# Altium PCB My heater.PcbDoc (part 1 of 2)
Units mm, origin at the board's own origin, x right, y up, seen from the top; angles counter-clockwise.
Board outline 202.87 x 80.18 mm, 2 copper layers (Top Layer, Bottom Layer); 154 components, 161 nets, 495 pads, 412 vias.
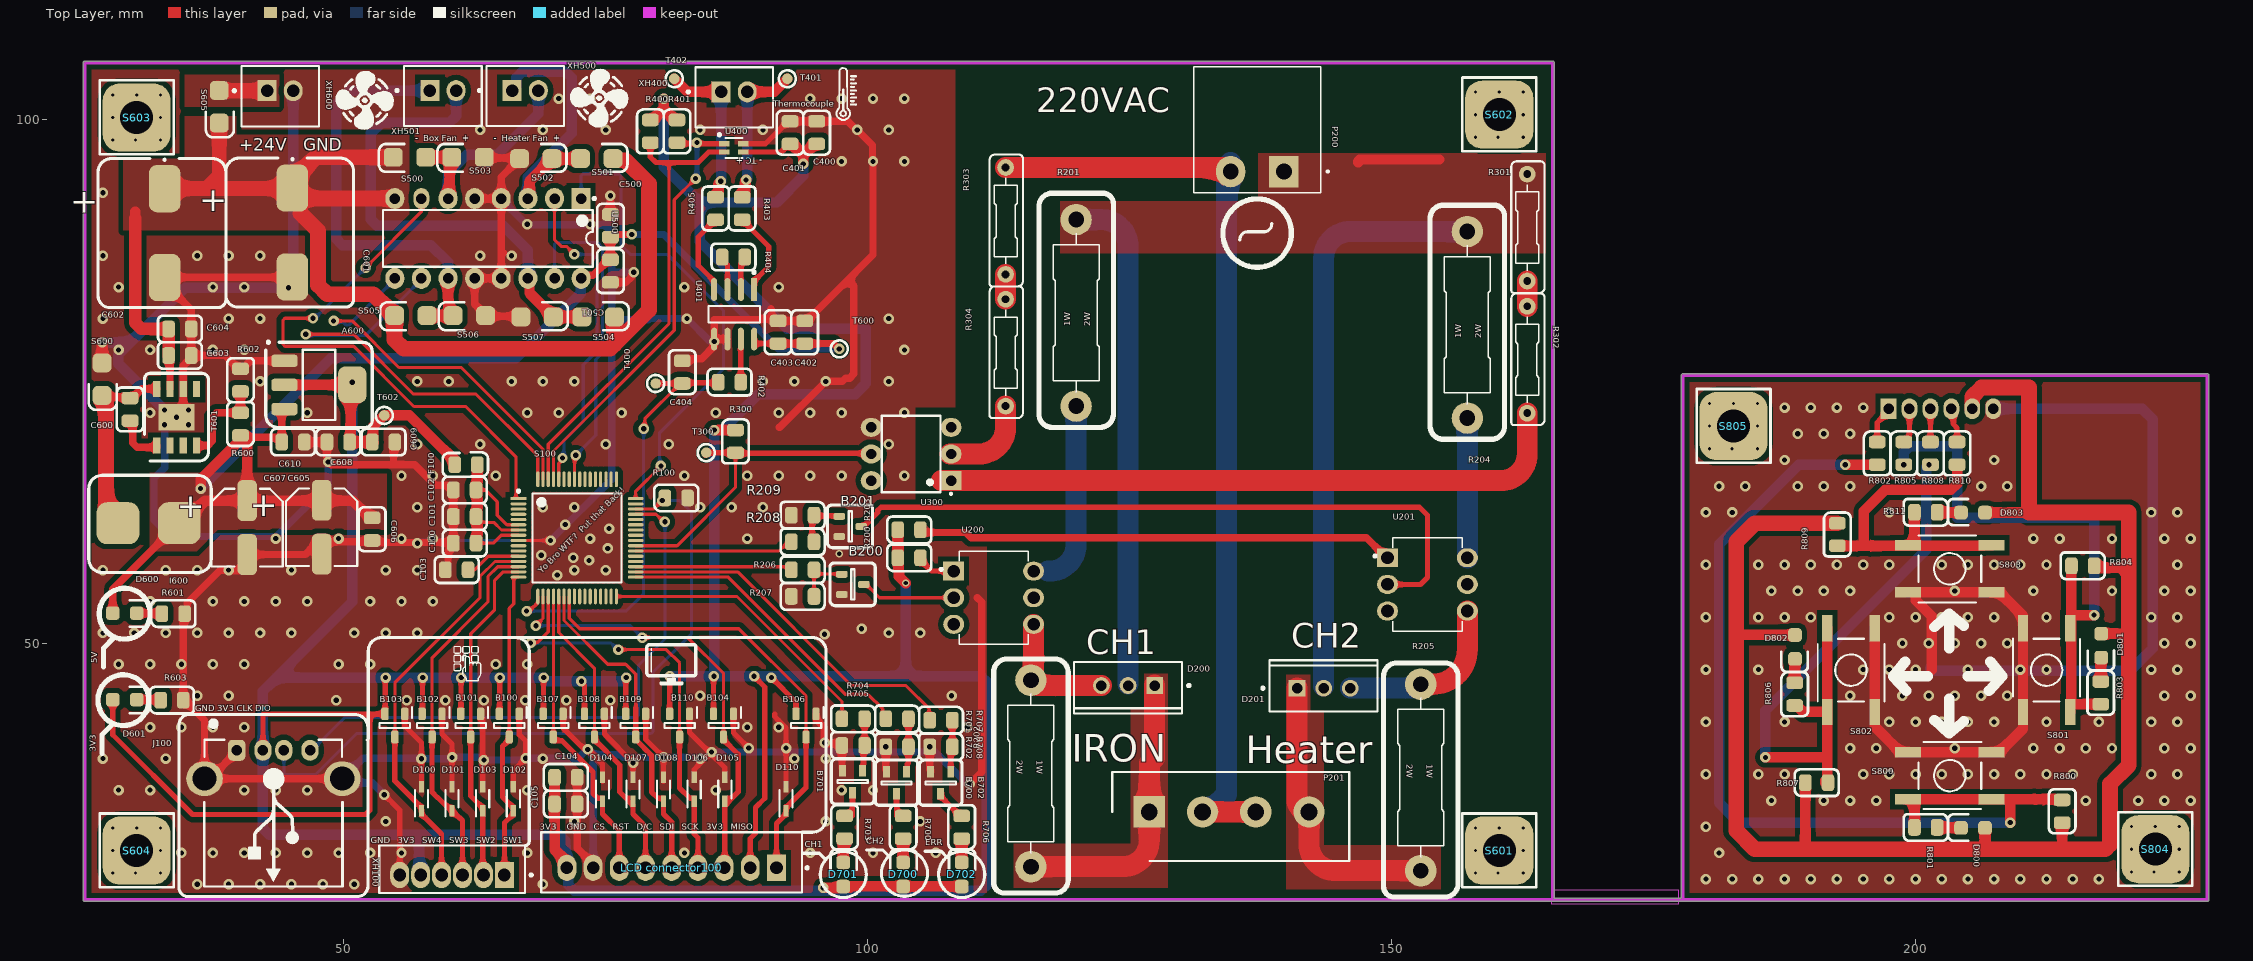
[diagram p0: Top Layer view]
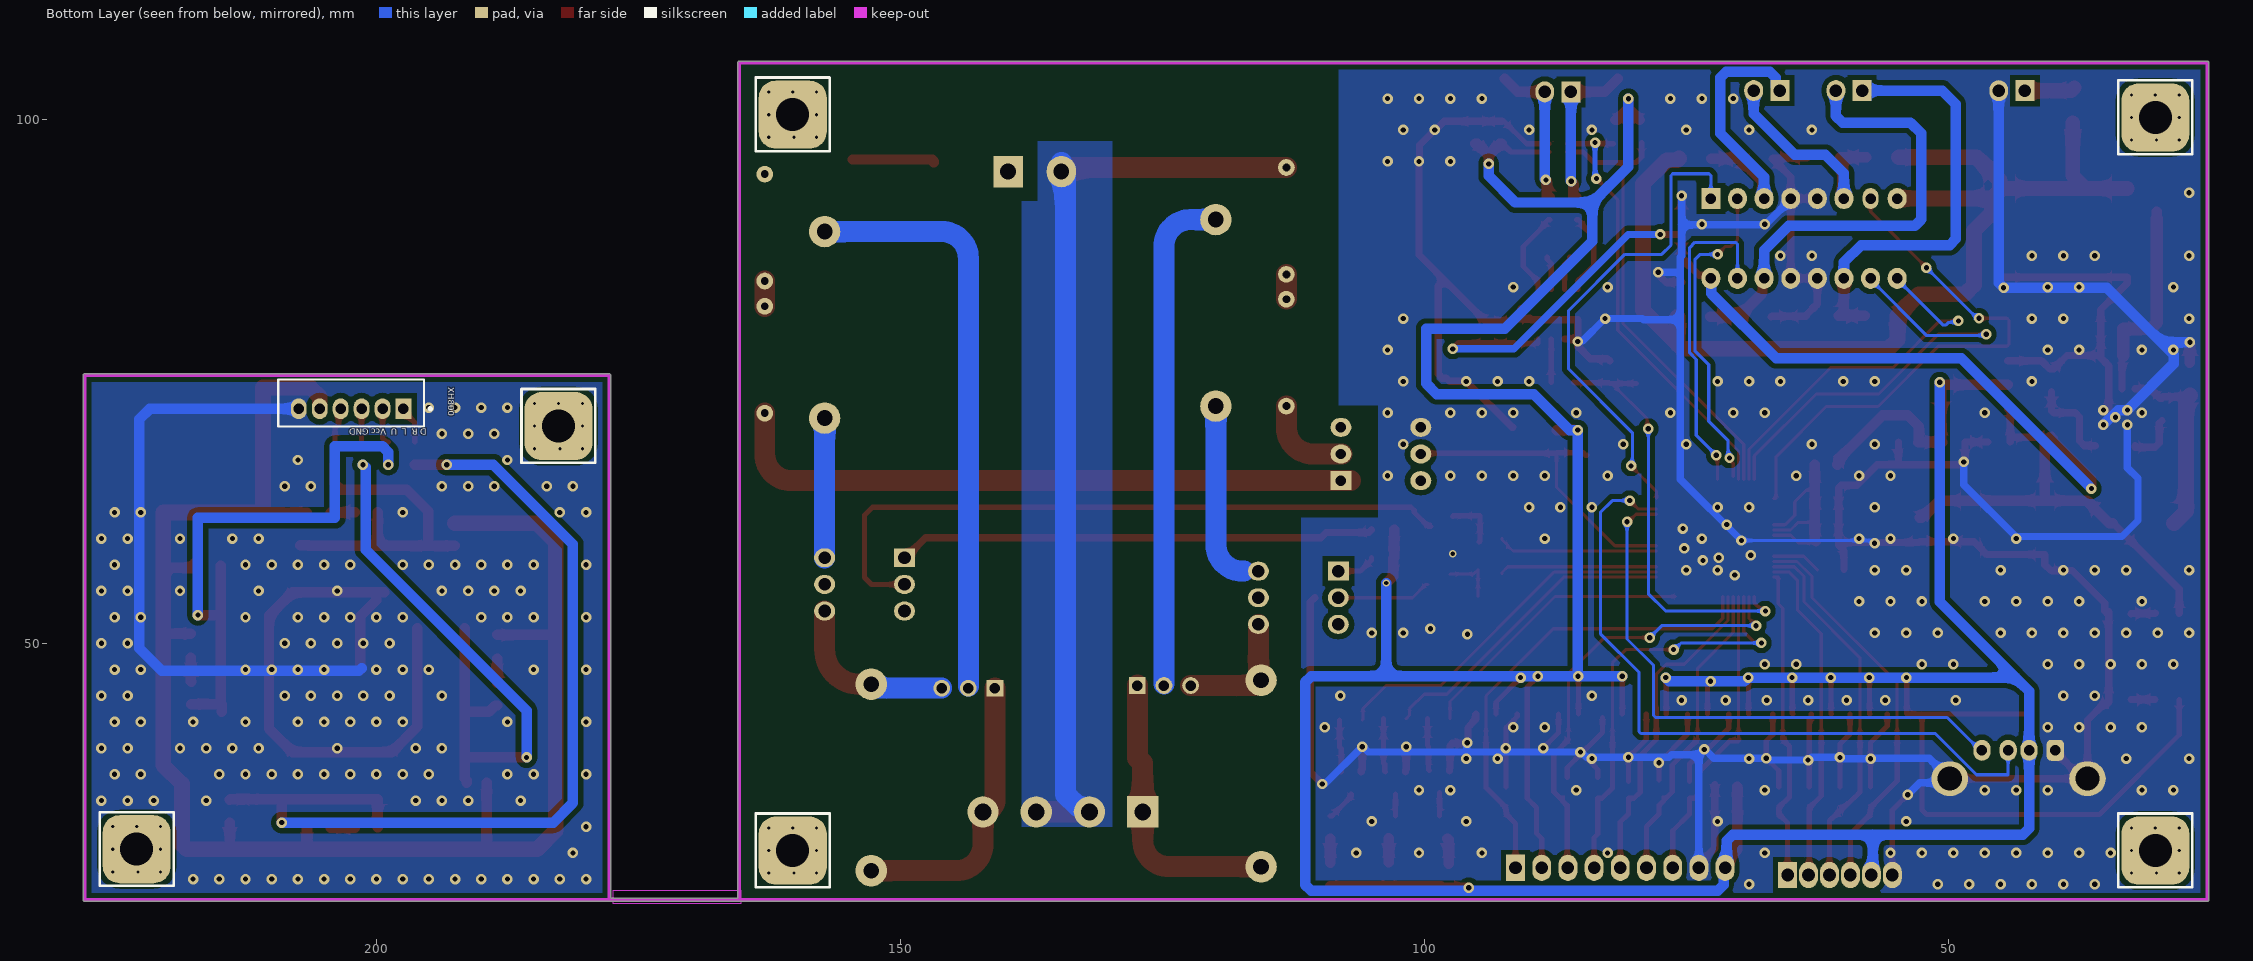
[diagram p1: Bottom Layer view, seen from below]
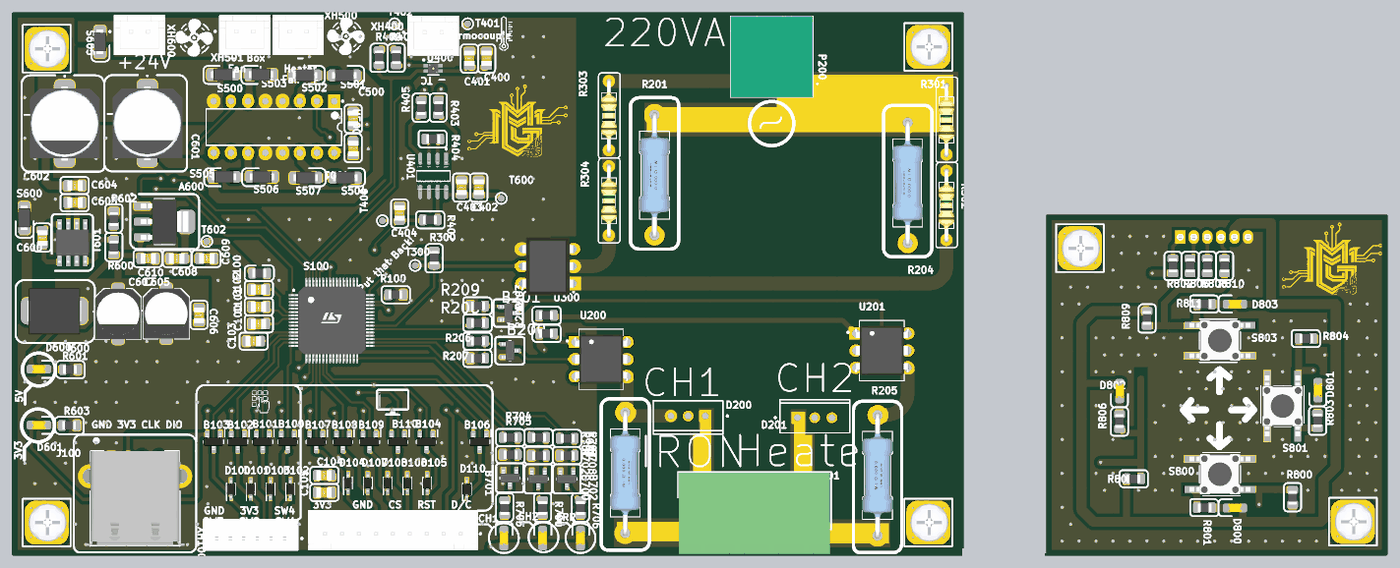
[diagram p3: 3D render of the assembled board from above, using the file's embedded part models]

## Layer stack, top to bottom
Top Solder: solder mask 0.0102, Solder Resist, Dk 3.5
Top Layer: signal copper 0.0356
Dielectric 1: dielectric 0.32, FR-4, Dk 4.8
Bottom Layer: signal copper 0.0356
Bottom Solder: solder mask 0.0102, Solder Resist, Dk 3.5

## Board outline
25.123,25.527 25.123,105.41 cw(c25.273,105.41) 25.273,105.56 165.354,105.56 cw(c165.354,105.41) 165.504,105.41 165.504,25.677 177.65,25.677 177.65,75.565 cw(c177.8,75.565) 177.8,75.715 227.838,75.715 cw(c227.838,75.565) 227.988,75.565 227.988,25.527 cw(c227.838,25.527) 227.838,25.377 25.273,25.377 cw(c25.273,25.527)
cut-out: 165.227,26.416 165.227,25.146 177.419,25.146 177.419,26.416

## Design rules (kind name [scope] priority, off if disabled: settings)
Clearance Clearance_1 [InNamedPolygon('NONET_L-01_P-001')] p1: gap=0.5 ignorepadtopadclearanceinfootprint=TRUE
Clearance [All] p2: gap=0.2 ignorepadtopadclearanceinfootprint=TRUE
PolygonConnect PolygonConnect_9 [All] p1: connectstyle=Direct reliefconductorwidth=0.254 reliefentries=4 polygonreliefangle="90 Angle" airgapwidth=0.254
RoutingVias [All] p1: holewidth=0.711 width=1.27 viastyle="Through Hole" minholewidth=0.711 minwidth=1.27 maxholewidth=3 maxwidth=6
SolderMaskExpansion [All] p1: expansion=0.102 istentingtop=FALSE
SupplyNets "Schematic Supply Nets_10" [InNet('GND5')] p1: voltage=0.000
SupplyNets "Schematic Supply Nets_9" [InNet('VCC IN')] p2: voltage=0.000
SupplyNets "Schematic Supply Nets_8" [InNet('GND3')] p3: voltage=0.000
SupplyNets "Schematic Supply Nets_7" [InNet('+220V')] p4: voltage=0.000
SupplyNets "Schematic Supply Nets_6" [InNet('+5')] p5: voltage=0.000
SupplyNets "Schematic Supply Nets_5" [InNet('AGND')] p6: voltage=0.000
SupplyNets "Schematic Supply Nets_4" [InNet('GND')] p7: voltage=0.000
SupplyNets "Schematic Supply Nets_3" [InNet('+24')] p8: voltage=0.000
SupplyNets "Schematic Supply Nets_2" [InNet('3v3')] p9: voltage=0.000
SupplyNets "Schematic Supply Nets_1" [InNet('VCC')] p10: voltage=0.000
SupplyNets "Schematic Supply Nets" [InNet('GND2')] p11: voltage=0.000
Width [All] p1: maxlimit=6 minlimit=0.254 preferedwidth=0.254
30 further rules are at their usual default settings.

## Classes and differential pairs
component class "ZERO CROSS": R300 R301 R302 R303 R304 T300 U300
component class "Temp feedback": C400 C401 C402 C403 C404 R400 R401 R402 R403 R404 R405 T400 T401 T402 U400 U401 XH400
component class POWER: A600 C600 C601 C602 C603 C604 C605 C606 C607 C608 C609 C610 D600 D601 I600 R600 R601 R602 R603 S600 S601 S602 S603 S604 S605 T600 T601 T602 XH600
component class MCU: B100 B101 B102 B103 B104 B106 B107 B108 B109 B110 C100 C101 C102 C103 C104 C105 D100 D101 D102 D103 D104 D105 D106 D107 D108 D110 F100 J100 "LCD connector100" R100 S100 XH100
component class LEDs: B700 B701 B702 D700 D701 D702 R700 R701 R702 R703 R704 R705 R706 R707 R708
component class KEYPAD: D800 D801 D802 D803 R800 R801 R802 R803 R804 R805 R806 R807 R808 R809 R810 R811 S800 S801 S802 S803 S804 S805 XH800
component class "Fan Controller": C500 C501 S500 S501 S502 S503 S504 S505 S506 S507 U500 XH500 XH501
component class DIMMER: B200 B201 D200 D201 P200 P201 R200 R201 R202 R203 R204 R205 R206 R207 R208 R209 U200 U201

## Components (designator, comment, footprint, x,y, rotation, side; value= is the part's Value field where it differs from the comment)
A600 "AMS1117 3.3V" SOT230P700X180-4M 47.625,74.676 r180 top
B100 "Bat54s" PCBComponent_1#1 65.786,42.037 r270 top
B101 "Bat54s" PCBComponent_1#1 62.103,42.037 r270 top
B102 "Bat54s" PCBComponent_1#1 58.42,42.037 r270 top
B103 "Bat54s" PCBComponent_1#1 54.864,42.037 r270 top
B104 "Bat54s" PCBComponent_1#1 86.233,42.037 r270 top
B106 "Bat54s" PCBComponent_1#1 94.107,42.037 r270 top
B107 "Bat54s" PCBComponent_1#1 69.977,42.037 r270 top
B108 "Bat54s" PCBComponent_1#1 73.914,42.037 r270 top
B109 "Bat54s" PCBComponent_1#1 77.851,42.037 r270 top
B110 "Bat54s" PCBComponent_1#1 82.042,42.037 r270 top
B200 "BC817" BC817 98.679,55.753 r0 top
B201 "BC817" BC817 98.436,61.285 r0 top
B700 "BC817" PCBComponent_1#2 102.87,36.703 r270 top
B701 "BC817" PCBComponent_1#2 98.679,36.83 r270 top
B702 "BC817" PCBComponent_1#2 107.084,36.703 r270 top
C100 "Cap 4.7uf 0805" "Cap 0805" 61.341,59.69 r180 top
C101 "Cap 100nf 0805" "Cap 0805" 61.341,62.23 r180 top
C102 "Cap 100nf 0805" "Cap 0805" 61.341,64.77 r180 top
C103 "Cap 100nf 0805" "Cap 0805" 60.579,57.15 r180 top
C104 "Cap 100nf 0805" "Cap 0805" 70.993,37.338 r180 top
C105 "Cap 10uf 0805" "Cap 0805" 70.993,34.798 r180 top
C400 "Cap 10uf 0805" "Cap 0805" 95.25,98.933 r90 top
C401 "Cap 100nf 0805" "Cap 0805" 92.71,98.933 r90 top
C402 "Cap 10uf 0805" "Cap 0805" 94.107,79.883 r90 top
C403 "Cap 100nf 0805" "Cap 0805" 91.567,79.883 r90 top
C404 "Cap 100nf 0805" "Cap 0805" 82.423,76.073 r90 top
C500 "Cap 10uf 0805" "Cap 0805" 75.565,90.043 r90 top
C501 "Cap 100nf 0805" "Cap 0805" 75.311,85.344 r270 top
C600 "Cap 10nf 0805" "Cap 0805" 29.464,72.136 r270 top
C601 "Cap 220uf 10x10" "Cap 10x10" 44.577,89.838 r270 top
C602 "Cap 220uf 10x10" "Cap 10x10" 32.385,89.789 r270 top
C603 "Cap 10nf 0805" "Cap 0805" 34.544,77.343 r0 top
C604 "Cap 4.7uf 0805" "Cap 0805" 34.544,79.883 r0 top
C605 "Cap 3300uf 6.3X5.6 SMD 10V" "CAP 6X5" 47.879,61.087 r270 top
C606 "Cap 10nf 0805" "Cap 0805" 52.578,60.706 r270 top
C607 "Cap 100uf 6.3X5.6 SMD 10V" "CAP 6X5" 40.767,61.052 r270 top
C608 "Cap 10uf 0805" "Cap 0805" 49.276,69.342 r180 top
C609 "Cap 10uf 0805" "Cap 0805" 53.975,69.088 r0 top
C610 "Cap 10uf 0805" "Cap 0805" 45.339,69.088 r0 top
D100 "PESD3V3U1UA,115" SOD2512X110N 57.404,35.172 r90 top
D101 "PESD3V3U1UA,115" SOD2512X110N 60.325,35.172 r90 top
D102 "PESD3V3U1UA,115" SOD2512X110N 66.167,35.172 r90 top
D103 "PESD3V3U1UA,115" SOD2512X110N 63.246,35.172 r90 top
D104 "PESD3V3U1UA,115" SOD2512X110N 74.676,36.061 r90 top
D105 "PESD3V3U1UA,115" SOD2512X110N 86.36,36.061 r90 top
D106 "PESD3V3U1UA,115" SOD2512X110N 83.439,36.061 r90 top
D107 "PESD3V3U1UA,115" SOD2512X110N 77.597,36.061 r90 top
D108 "PESD3V3U1UA,115" SOD2512X110N 80.518,36.061 r90 top
D110 "PESD3V3U1UA,115" SOD2512X110N 92.202,35.172 r90 top
D200 "BTA16-600CW3G" ONSC-TO-220-3-221A-07 124.841,45.974 r270 top
D201 "BTA16-600CW3G" ONSC-TO-220-3-221A-07 143.51,45.72 r90 top
D600 "LED Green 0805" FP-SM0805YCL-MFG 29.083,52.883 r0 top
D601 "LED Yellow0805" FP-SM0805YCL-MFG 29.083,44.628 r0 top
D700 "LED Blue 0805" FP-SM0805YCL-MFG 103.378,27.94 r90 top
D701 "LED Blue 0805" FP-SM0805YCL-MFG 97.663,27.94 r90 top
D702 "LED Blue 0805" FP-SM0805YCL-MFG 108.966,27.94 r90 top
D800 "LED Blue 0805" FP-SM0805YCL-MFG 205.486,32.385 r180 top
D801 "LED Blue 0805" FP-SM0805YCL-MFG 217.729,49.784 r270 top
D802 "LED Blue 0805" FP-SM0805YCL-MFG 188.493,49.657 r270 top
D803 "LED Blue 0805" FP-SM0805YCL-MFG 205.486,62.484 r180 top
F100 "ferrite bead 0805" PCBComponent_1#3 61.468,67.056 r180 top
I600 "Inductor 15uh 7.3x6.6" INDM7366X30M 31.369,61.468 r0 top
J100 "USB A" "90 degree" 43.273,38.65 r0 top
"LCD connector100" "9 PIN XH 2.54mm" "XH 9 PIN" 81.795,28.702 r0 top
P200 "phoenix 2 pin 5mm" "phoenix 2 pin 5mm" 136.144,98.806 r180 top
P201 "phoenix 4 pin 5mm" "phoenix 4 pin 5mm" 134.493,31.369 r0 top
R100 "Resistor 10k Ohm 0805 %" "Res 0805" 81.788,63.881 r180 top
R200 "Resistor 100 Ohm 0805 %" "Res 0805" 104.013,58.166 r180 top
R201 "Res 270 Ohm Dip" "Res Dip 2W" 120.015,81.661 r90 top
R202 "Res 270 Ohm Dip" "Res Dip 2W" 115.443,37.465 r270 top
R203 "Resistor 100 Ohm 0805 %" "Res 0805" 104.013,60.833 r180 top
R204 "Res 270 Ohm Dip" "Res Dip 2W" 157.353,80.518 r90 top
R205 "Res 270 Ohm Dip" "Res Dip 2W" 152.654,37.084 r270 top
R206 "Resistor 4.7k Ohm 0805 %" "Res 0805" 93.726,57.023 r0 top
R207 "Resistor 10k Ohm 0805 %" "Res 0805" 93.726,54.483 r0 top
R208 "Resistor 4.7k Ohm 0805 %" "Res 0805" 93.726,59.69 r0 top
R209 "Resistor 10k Ohm 0805 %" "Res 0805" 93.726,62.23 r0 top
R300 "Res 10K Ohm 0805 %" "Res 0805" 87.376,69.215 r90 top
R301 "Res 100K Ohm Dip 0.25W" "Res Dip 0.25W" 163.068,89.281 r90 top
R302 "Res 100K Ohm Dip 0.25W" "Res Dip 0.25W" 163.068,76.668 r90 top
R303 "Res 100K Ohm Dip 0.25W" "Res Dip 0.25W" 113.284,89.916 r90 top
R304 "Res 100K Ohm Dip 0.25W" "Res Dip 0.25W" 113.284,77.343 r90 top
R400 "Res 10K Ohm 0805 %" "Res 0805" 79.248,98.806 r90 top
R401 "Res 10K Ohm 0805 %" "Res 0805" 81.788,98.806 r90 top
R402 "Res 100 Ohm 0805 %" "Res 0805" 86.868,74.93 r180 top
R403 "Res 100 Ohm 0805 %" "Res 0805" 88.011,91.567 r270 top
R404 "Res 330 Ohm 0805 %" "Res 0805" 87.122,86.868 r0 top
R405 "Res 100 Ohm 0805 %" "Res 0805" 85.471,91.567 r270 top
R600 "Resistor 6.8K Ohm 0805 %" "Res 0805" 40.132,70.993 r270 top
R601 "Resistor 330 Ohm 0805 %" "Res 0805" 33.782,52.832 r180 top
R602 "Resistor 2.2K Ohm 0805 %" "Res 0805" 40.132,75.184 r270 top
R603 "Resistor 330 Ohm 0805 %" "Res 0805" 33.655,44.577 r180 top
R700 "Resistor  120 Ohm 0805 5%" "Res 0805" 103.378,32.512 r270 top
R701 "Resistor  10k Ohm 0805 5%" "Res 0805" 102.743,42.799 r0 top
R702 "Resistor  10k Ohm 0805 5%" "Res 0805" 102.743,40.132 r0 top
R703 "Resistor  120 Ohm 0805 5%" "Res 0805" 97.79,32.512 r270 top
R704 "Resistor  10k Ohm 0805 5%" "Res 0805" 98.552,42.799 r0 top
R705 "Resistor  10k Ohm 0805 5%" "Res 0805" 98.552,40.259 r0 top
R706 "Resistor  120 Ohm 0805 5%" "Res 0805" 108.966,32.512 r270 top
R707 "Resistor  10k Ohm 0805 5%" "Res 0805" 106.934,42.672 r0 top
R708 "Resistor  10k Ohm 0805 5%" "Res 0805" 106.934,40.132 r0 top
R800 "Resistor 10K Ohm 0805 %" "Res 0805" 213.995,34.036 r270 top
R801 "Resistor  120 Ohm 0805 5%" "Res 0805" 200.914,32.436 r0 top
R802 "Resistor 220 Ohm 0805 %" "Res 0805" 196.342,68.072 r90 top
R803 "Resistor  120 Ohm 0805 5%" "Res 0805" 217.678,45.212 r90 top
R804 "Resistor 10K Ohm 0805 %" "Res 0805" 215.9,57.404 r0 top
R805 "Resistor 220 Ohm 0805 %" "Res 0805" 198.882,68.072 r90 top
R806 "Resistor  120 Ohm 0805 5%" "Res 0805" 188.468,45.085 r90 top
R807 "Resistor 10K Ohm 0805 %" "Res 0805" 190.627,36.703 r180 top
R808 "Resistor 220 Ohm 0805 %" "Res 0805" 201.422,68.072 r90 top
R809 "Resistor 10K Ohm 0805 %" "Res 0805" 192.532,60.325 r90 top
R810 "Resistor 220 Ohm 0805 %" "Res 0805" 203.962,68.072 r90 top
R811 "Resistor  120 Ohm 0805 5%" "Res 0805" 200.914,62.509 r0 top
S100 "STM32G070RBT6" STM32G070RBT6 71.882,59.436 r0 top
S500 "SS34" PCBComponent_1#4 56.261,96.393 r0 top
S501 "SS34" PCBComponent_1#4 74.142,96.266 r180 top
S502 "SS34" PCBComponent_1#4 68.326,96.266 r180 top
S503 "SS34" PCBComponent_1#4 61.849,96.393 r0 top
S504 "SS34" PCBComponent_1#4 74.269,81.153 r180 top
S505 "SS34" PCBComponent_1#4 56.388,81.28 r0 top
S506 "SS34" PCBComponent_1#4 61.976,81.28 r0 top
S507 "SS34" PCBComponent_1#4 68.453,81.153 r180 top
S600 "SS34" PCBComponent_1#4 26.924,75.21 r90 top
S601 "Screw 3mm" PCBComponent_1#5 160.274,30.226 r0 top
S602 "Screw 3mm" PCBComponent_1#5 160.274,100.457 r0 top
S603 "Screw 3mm" PCBComponent_1#5 30.226,100.186 r0 top
S604 "Screw 3mm" PCBComponent_1#5 30.226,30.226 r0 top
S605 "SS34" PCBComponent_1#4 38.1,101.219 r90 top
S800 "Push Button Switch SMD" "Push Button Switch SMD" 231.743,64.679 r180 top
S801 "Push Button Switch SMD" "Push Button Switch SMD" 185.202,75.914 r270 top
S802 "Push Button Switch SMD" "Push Button Switch SMD" 221.143,18.972 r90 top
S803 "Push Button Switch SMD" "Push Button Switch SMD" 174.801,29.809 r0 top
S804 "Screw 3mm" PCBComponent_1#5 222.885,30.353 r0 top
S805 "Screw 3mm" PCBComponent_1#5 182.626,70.739 r0 top
T300 "Testpoint" PCBComponent_1#6 84.582,68.199 r270 top
T400 "Testpoint" PCBComponent_1#6 79.756,74.803 r180 top
T401 "Testpoint" PCBComponent_1#6 92.329,103.886 r270 top
T402 "Testpoint" PCBComponent_1#6 81.534,103.886 r270 top
T600 "Testpoint" PCBComponent_1#6 97.282,78.105 r90 top
T601 "TPS5450DDAR" PCBComponent_1#7 34.29,71.456 r90 top
T602 "Testpoint" PCBComponent_1#6 53.848,71.755 r90 top
U200 "MOC3021" DIP762W45P254L889H508Q6 112.014,54.356 r0 top
U201 "MOC3021" DIP762W45P254L889H508Q6 153.416,55.626 r0 top
U300 "H11AA1" DIP762W50P254L730H410Q6 104.14,68.072 r180 top
U400 "SHT40-AD1B-R2" FP-SHT40-AD1B-R2-MFG 87.249,97.282 r0 top
U401 "INA826AIDR" FP-D0008A-IPC_B 87.249,81.407 r270 top
U500 "L293D" STM-L293D-16 63.754,88.646 r270 top
XH100 "6 PIN XH 2.54mm" "XH 6 PIN"#1 60.579,28.314 r0 top
XH400 "2 pin XH 2.54mm" "XH 2 pin" 87.249,102.108 r0 top
XH500 "2 pin XH 2.54mm" "XH 2 pin" 67.31,102.235 r0 top
XH501 "2 pin XH 2.54mm" "XH 2 pin" 59.456,102.235 r0 top
XH600 "2 pin XH 2.54mm" "XH 2 pin" 43.922,102.218 r0 top
XH800 "6 PIN XH 2.54mm" "XH 6 PIN"#2 202.168,72.813 r180 bottom

## Footprints (in the part's own frame and the unit in brackets; to place one, negate y for a bottom-side part, rotate by r counter-clockwise, add the part's x,y. Pads: shape width x height; smd on the part's side, far side on the other; paste and mask are expansions set on the pad)
"90 degree" [mm] "THD, 4-Leads, Body 13.13x14mm, Pitch 2.5mm"
  rrect50% 1.65x2 hole 1: 1(-3.5,1.144)
  oval 1.65x2 hole 1: 2(-1,1.144) 3(1,1.144) 4(3.5,1.144)
  oval 3.5x3.3 hole 2.3: 5(-6.57,-1.566) 6(6.57,-1.566)
  silkscreen extent -9.02,-12.83 9.02,4.57, body extent -8.12,-11.85 8.12,2.15, height 7.72
BC817 [mm]
  rrect50% 1.1x0.65 smd: 1(-1.154,0.833) 2(-1.154,-1.087) 3(0.946,-0.127)
  silkscreen extent -2.29,-2.16 2.03,1.91, body extent -1.3,-1.58 1.1,1.32, height 1.1
"CAP 6X5" [mm] "Aluminum Electrolytic Capacitor, Body 7.20x6.60x5.70mm, IPC Low Density"
  rrect50% 3.9x1.85 smd: 1(-2.575,0) 2(2.575,0)
  silkscreen extent -3.7,-3.4 3.7,3.4, body extent -3.7,-3.4 3.7,3.4, height 6.4
"Cap 10x10" [mm]
  rrect50% 4.5x3 smd: 1(-3.605,0.508) 2(4.875,0.508)
  silkscreen extent -6.48,-5.84 7.75,6.35, body extent -4.81,-4.64 6.08,5.66, height 10.8
"Cap 0805" [mm]
  rrect50% 1.2x1.6 smd: 1(-1.27,0.127) 2(0.889,0.127)
  silkscreen extent -2.29,-1.14 1.91,1.4, body extent -1.28,-0.64 1.02,0.91, height 1.5
DIP762W45P254L889H508Q6 [mm]
  rect 2x1.8 hole 1.2: 1(-3.81,2.54)
  oval 2x1.8 hole 1.2: 2(-3.81,0) 3(-3.81,-2.54) 4(3.81,-2.54) 5(3.81,0) 6(3.81,2.54)
  silkscreen extent -5.12,-4.45 3.3,4.45, body extent -3.94,-3.65 3.94,3.65, height 5
DIP762W50P254L730H410Q6 [mm]
  rect 2x1.8 hole 1: 1(-3.81,2.54)
  oval 2x1.8 hole 1: 2(-3.81,0) 3(-3.81,-2.54) 4(3.81,-2.54) 5(3.81,0) 6(3.81,2.54)
  silkscreen extent -3.9,-3.65 2.8,3.9, body extent -4.11,-4.3 4.11,4.3, height 4.61
FP-D0008A-IPC_B [mm]
  rect 2.169x0.582 smd paste+0 mask+0: 1(-2.364,1.905)
  rrect100% 2.169x0.582 smd paste+0 mask+0: 2(-2.364,0.635) 3(-2.364,-0.635) 4(-2.364,-1.905) 5(2.364,-1.905) 6(2.364,-0.635) 7(2.364,0.635) 8(2.364,1.905)
  silkscreen extent -4.12,-2.45 0.78,2.45, body extent -3.7,-2.7 3.7,2.7, height 0.25
FP-SHT40-AD1B-R2-MFG [mm]
  rect 1x0.5 smd paste+0 mask+0: 1(-0.94,0.406) 2(-0.94,-0.394) 3(0.864,-0.394) 4(0.864,0.406)
  Top Layer lines w0.008: 0.432,0.584 0.432,0.66
  silkscreen extent -1.53,-0.95 0.8,1.39, body extent -1.05,-0.9 1.05,0.9, height 0.25
FP-SM0805YCL-MFG [mm]
  rrect50% 1.3x1.3 smd paste+0 mask+0: 1(-1.143,0) 2(1.143,0)
  silkscreen extent 0.47,-1.3 2.37,1.22, body extent -1.73,-0.85 1.73,0.85, height 0.25
INDM7366X30M [mm] "Molded Inductor, 2-Leads, Body 7.30x6.60mm, IPC Low Density"
  rrect50% 4.1x4 smd: 1(-2.921,0) 2(2.921,0)
  silkscreen extent -5.71,-4.7 5.97,4.57, body extent -4.02,-3.45 4.02,3.45, height 3
ONSC-TO-220-3-221A-07 [mm] "FM, 3-Leads, Body 10.3x4.85mm, Pitch 2.54mm"
  rect 1.6x1.6 hole 1: 1(0,2.54)
  round 1.6 hole 1: 2(0,0) 3(0,-2.54)
  silkscreen extent -2.23,-5.15 2.67,5.93, body extent -2.21,-5.15 2.64,5.15, height 19.68
PCBComponent_1#1 [mm]
  rrect50% 1.2x0.7 smd: 1(-1.227,0.95) 2(-1.227,-0.95) 3(0.973,0)
  silkscreen extent -1.91,-1.45 0.1,1.65, body extent -1.33,-1.45 1.07,1.45, height 0.95
PCBComponent_1#2 [mm]
  rect 1.1x0.65 smd: 1(-1.027,0.833) 2(-1.027,-1.087) 3(1.073,-0.127)
  silkscreen extent -2.16,-2.16 2.16,1.91, body extent -1.18,-1.58 1.22,1.32, height 1.1
PCBComponent_1#3 [mm]
  rrect50% 1.2x1.6 smd: 1(-1.27,0) 2(0.889,0)
  silkscreen extent -2.29,-1.17 2.03,1.17, body extent -1.13,-0.63 0.87,0.63, height 0.6
PCBComponent_1#4 [mm]
  rrect50% 1.8x1.8 smd: 1(-1.55,0) 2(1.55,0)
  silkscreen extent -2.92,-1.4 -0.51,1.27, body extent -1.8,-0.9 1.8,0.9, height 1.43
PCBComponent_1#5 [mm]
  round 0.6 hole 0.3: 1(-2.286,-2.159) 1(-2.286,0) 1(-2.286,2.159) 1(-0.127,-2.159) 1(0,2.159) 1(2.286,-2.159) 1(2.286,0) 1(2.286,2.159)
  rrect50% 6.5x6.5 hole 3.15 mask+0.1: 1(0,0)
  silkscreen extent -3.52,-3.49 3.53,3.54, body extent -2.67,-2.79 2.93,2.81, height 3.88
PCBComponent_1#6 [mm]
  round 1 smd: 1(0,0)
  silkscreen extent -0.81,-0.81 0.81,0.81
PCBComponent_1#7 [mm]
  rect 1.525x0.7 smd: 1(-2.585,2.159) 2(-2.585,0.889) 3(-2.585,-0.381) 4(-2.585,-1.651) 5(2.839,-1.651) 6(2.839,-0.381) 7(2.839,0.889) 8(2.839,2.159)
  rect 2.56x3.45 smd: 9(0.127,0.254)
  silkscreen extent -4.06,-2.79 4.32,3.3, body extent -2.87,-2.2 3.13,2.7, height 1.7
"phoenix 2 pin 5mm" [mm]
  rect 2.8x3 hole 1.5: 1(-3.572,3.777)
  oval 2.8x3 hole 1.5: 2(1.508,3.777)
  silkscreen extent -7.86,-6.22 5.05,5.78, body extent -7.06,-6.22 5.02,5.78, height 8.6
"phoenix 4 pin 5mm" [mm]
  rect 3x3 hole 1.6: 1(-7.62,2.54)
  round 3 hole 1.6: 2(-2.54,2.54) 3(2.54,2.54) 4(7.62,2.54)
  silkscreen extent -11.16,-2.16 11.46,6.34, body extent -11.03,-5.75 11.29,6.25, height 8.45
"Push Button Switch SMD" [mm]
  rect 2.5x1 smd: 1(24.479,29.555) 1(32.463,29.555) 2(24.479,25.055) 2(32.463,25.055)
  silkscreen extent 25.47,24.1 31.47,30.48, body extent 23.97,24.3 32.97,30.3, height 5
"Res 0805" [mm]
  rrect50% 1.2x1.6 smd: 1(-1.016,0) 2(1.143,0)
  silkscreen extent -2.03,-1.27 2.16,1.27, body extent -0.87,-0.63 1.13,0.63, height 0.6
"Res Dip 0.25W" [mm]
  round 1.6 hole 0.75: 1(5.501,0.127) 2(-4.699,0.127)
  silkscreen extent -5.84,-1.52 6.73,1.65, body extent -5,-1.03 5.77,1.28, height 3.63
"Res Dip 2W" [mm]
  round 3 hole 1.5: 1(8.783,0.127) 2(-9.017,0.127)
  silkscreen extent -11.05,-3.43 11.3,3.68, body extent -9.38,-2.12 9.15,2.38, height 5.22
SOD2512X110N [mm]
  rect 1.1x0.5 smd: 1(-1.15,0) 2(1.15,0)
  silkscreen extent -1.7,-0.63 0.85,0.63, body extent -1.24,-0.62 1.24,0.63, height 0.93
SOT230P700X180-4M [mm] "SOT223, 4-Leads, Body 6.50x7.00mm (avg), Pitch 2.30mm, IPC Low Density"
  rrect50% 2.5x1.2 smd: 1(3.302,-2.286) 2(3.302,0.014) 3(3.302,2.314)
  rrect50% 2.7x3.5 smd: 2(-3.175,0)
  silkscreen extent -5.08,-4.19 5.08,4.06, body extent -3.5,-3.35 3.5,3.35, height 1.8
STM32G070RBT6 [mm]
  rect 1.5x0.3 smd paste+0 mask+0: 1(-5.214,4.381)
  rrect100% 1.5x0.3 smd paste+0 mask+0: 2(-5.214,3.881) 3(-5.214,3.381) 4(-5.214,2.881) 5(-5.214,2.381) 6(-5.214,1.881) 7(-5.214,1.381) 8(-5.214,0.881) 9(-5.214,0.381) 10(-5.214,-0.119) 11(-5.214,-0.619) 12(-5.214,-1.119) 13(-5.214,-1.619) 14(-5.214,-2.119) 15(-5.214,-2.619) 16(-5.214,-3.119) 33(5.968,-3.119) 34(5.968,-2.619) 35(5.968,-2.119) 36(5.968,-1.619) 37(5.968,-1.119) 38(5.968,-0.619) 39(5.968,-0.119) 40(5.968,0.381) 41(5.968,0.881) 42(5.968,1.381) 43(5.968,1.881) 44(5.968,2.381) 45(5.968,2.881) 46(5.968,3.381) 47(5.968,3.881) 48(5.968,4.381)
  rrect100% 0.3x1.5 smd paste+0 mask+0: 17(-3.373,-4.96) 18(-2.873,-4.96) 19(-2.373,-4.96) 20(-1.873,-4.96) 21(-1.373,-4.96) 22(-0.873,-4.96) 23(-0.373,-4.96) 24(0.127,-4.96) 25(0.627,-4.96) 26(1.127,-4.96) 27(1.627,-4.96) 28(2.127,-4.96) 29(2.627,-4.96) 30(3.127,-4.96) 31(3.627,-4.96) 32(4.127,-4.96) 49(4.127,6.222) 50(3.627,6.222) 51(3.127,6.222) 52(2.627,6.222) 53(2.127,6.222) 54(1.627,6.222) 55(1.127,6.222) 56(0.627,6.222) 57(0.127,6.222) 58(-0.373,6.222) 59(-0.873,6.222) 60(-1.373,6.222) 61(-1.873,6.222) 62(-2.373,6.222) 63(-2.873,6.222) 64(-3.373,6.222)
  silkscreen extent -5.34,-3.62 4.63,5.22, body extent -5.84,-5.65 6.73,6.92, height 0.25
STM-L293D-16 [mm] "DIP, 16-Leads, Body 20x6.85mm, Pitch 2.54mm"
  rect 2x1.8 hole 1: 1(-3.81,8.89)
  oval 2x1.8 hole 1: 2(-3.81,6.35) 3(-3.81,3.81) 4(-3.81,1.27) 5(-3.81,-1.27) 6(-3.81,-3.81) 8(-3.81,-8.89) 9(3.81,-8.89) 10(3.81,-6.35) 11(3.81,-3.81) 12(3.81,-1.27) 13(3.81,1.27) 14(3.81,3.81) 15(3.81,6.35) 16(3.81,8.89)
  oval 2x1.5 hole 1: 7(-3.81,-6.35)
  silkscreen extent -3.93,-10 2.7,10.27, body extent -3.93,-10 3.93,10, height 5.1
"XH 2 pin" [mm]
  rect 1.8x2 hole 1.2 paste-2539.97 mask+0: 1(-1.25,0.525)
  oval 1.8x2 hole 1.2 paste-2539.97 mask+0: 2(1.25,0.525)
  silkscreen extent -4.5,-2.88 3.7,2.88, body extent -3.8,-2.98 3.8,2.98, height 0.25
"XH 6 PIN"#1 [mm]
  rect 1.8x2.5 hole 1.2 paste-2539.97 mask+0: 1(4.746,-0.423)
  oval 1.8x2.5 hole 1.2 paste-2539.97 mask+0: 2(2.746,-0.423) 3(0.746,-0.423) 4(-1.254,-0.423) 5(-3.254,-0.423) 6(-5.254,-0.423)
  silkscreen extent -7.2,-2.12 7.42,2.38, body extent -7.3,-2.22 6.8,2.48, height 0.25
"XH 6 PIN"#2 [mm]
  rect 1.5x2 hole 1 paste-2539.97 mask+0: 1(4.746,-0.423)
  oval 1.5x2 hole 1 paste-2539.97 mask+0: 2(2.746,-0.423) 3(0.746,-0.423) 4(-1.254,-0.423) 5(-3.254,-0.423) 6(-5.254,-0.423)
  silkscreen extent -7.2,-2.12 7.42,2.38, body extent -7.2,-2.12 6.7,2.38, height 6
"XH 9 PIN" [mm]
  rect 1.8x2.5 hole 1.2 paste-2539.97 mask+0: 1(9.492,-0.127)
  oval 1.8x2.5 hole 1.2 paste-2539.97 mask+0: 2(6.992,-0.127) 3(4.492,-0.127) 4(1.992,-0.127) 5(-0.508,-0.127) 6(-3.008,-0.127) 7(-5.508,-0.127) 8(-8.008,-0.127) 9(-10.508,-0.127)
  silkscreen extent -12.96,-2.48 12.54,3.27, body extent -13.06,-2.58 12.04,3.37, height 0.25

## Part data
C100 C101 C102 C103 C104 C105 C400 C401 C402 C403 C404 C500 C501 C600 C603 C604 C606 C608 C609 C610: library part "Cap 0805"
C601 C602: library part "Cap 10X10"
C605 C607: library part "Cap 6.3X5.6"
D100 D101 D102 D103 D104 D105 D106 D107 D108 D110: "TVS Diode (Uni-directional)", Manufacturer_Name=Nexperia, Mouser Part Number=771-PESD3V3U1UA-T/R, Arrow Part Number=PESD3V3U1UA,115, Arrow Price/Stock=https://www.arrow.com/en/products/pesd3v3u1ua115/nexperia?utm_currency=USD&region=nac, Datasheet Link=https://assets.nexperia.com/documents/data-sheet/PESD3V3U1UA_UB_UL.pdf, Height=1.1mm, Manufacturer_Part_Number=PESD3V3U1UA,115, Mouser Price/Stock=https://www.mouser.co.uk/ProductDetail/Nexperia/PESD3V3U1UA115?qs=LOCUfHb8d9um8sDoel6KgQ%3D%3D
D200 D201: library part CMP-1070-00058-1, "Triacs, Silicon Bidirectional Thyristor, 3-Pin TO-220, Pb-Free, Tube", Manufacturer="On Semiconductor", ComponentLink1Description="Manufacturer URL", ComponentLink1URL=http://www.onsemi.com/, ComponentLink2Description=Datasheet, ComponentLink2URL=http://www.onsemi.com/pub_link/Collateral/BTA16-600CW3-D.PDF, ComponentLink3Description="Package Specification", ComponentLink3URL=http://www.onsemi.com/pub_link/Collateral/221A-07.PDF, DatasheetVersion="Rev. 3", IGT Max (mA)=35, IT(RMS) Max (A)=16, ITSM Max (A)=170, Mounting Technology="Through Hole", PackageDescription="3-Pin Flange Mount, Vertical Straight Lead, Body 9.97 x 4.445 mm, Pitch 2.54 mm", PackageReference=TO-220-3-221A-07, PackageVersion="Rev. O, 07/2008", Packing=Tube, PartNumber=BTA16-600CW3G, RoHS=Pb-Free
D600 D601 D700 D701 D702 D800 D801 D802 D803: library part CMP-35283-000007-1, "LED YELLOW CLEAR 0805 SMD", Case Code (Imperial)=0805, Case Code (Metric)=2012, Color=Yellow, Forward Current=2mA, Forward Voltage=1.9V, Lens Color=Colorless, Max Operating Temperature=80°C, Min Operating Temperature=-30°C, Package Quantity=4000, Case/Package=0805, Dominant Wavelength=592nm, Height=0.8mm, Illumination Color=Yellow, Lead Free="Lead Free", Length=2mm, Lens Transparency=Clear, Luminous Intensity=11.5mcd, Mount="Surface Mount", Packaging="Tape and Reel", Test Current=2mA, Viewing Angle=130°, Width=1.2mm
I600: library part "Inductor 7.3x6.6", "TMPC0603H-150MG-D"
J100: library part "90 degree", "1 Port Right Angle Through Hole Mount Female Type A USB Connector, 4 Position, -55 to 85 degC, RoHS, Tube", Manufacturer="TE Connectivity", Package Description="4-Pin Through Hole Device, Body 14 x 13.13 mm, Pitch 2.5 mm", Package Reference=292303-1, Connector Mounting=PCB, Connector Type=USBA, Contact Material=Copper, Contact Plating=Gold, Contact Termination Type=Solder, Datasheet URL=http://www.farnell.com/cad/1653030.pdf, Datasheet Version=Feb-12, Gender=Receptacle, Manufacturer URL=http://www.te.com/, No. of Contacts=4, SVHC=NoSVHC(16-Jun-2014)
R100 R200 R203 R206 R207 R208 R209 R300 R400 R401 R402 R403 R404 R405 R600 R601 R602 R603 R700 R701 R702 R703 R704 R705 R706 R707 R708 R800 R801 R802 R803 R804 R805 R806 R807 R808 R809 R810 R811: library part "Res 0805"
R201 R202 R204 R205: library part "Res Dip"
R301 R302 R303 R304: library part "Res Dip 0.25W"
S601 S602 S603 S604 S804 S805: library part Screw
U200 U201: "Bá»™ cÃ¡ch ly quang Triac Äáº§u ra 5000Vrms 1 KÃªnh 6-DIP", Package="DIP-6 Isocom Components", Check_prices=https://www.snapeda.com/parts/MOC3021/Lite-On/view-part/?ref=eda, MF=Lite-On, MP=MOC3021, SnapEDA_Link=https://www.snapeda.com/parts/MOC3021/Lite-On/view-part/?ref=snap
U300: "Single Channel 30 V 5300 Vrms Optically Coupled Isolator Through Hole - PDIP-6", Package="DIP-6 Isocom Components", Availability="In Stock", Check_prices=https://www.snapeda.com/parts/H11AA1/Vishay/view-part/?ref=eda, MF=Vishay, MP=H11AA1, Price=None, Purchase-URL=https://pricing.snapeda.com/search/part/H11AA1/?ref=eda, SnapEDA_Link=https://www.snapeda.com/parts/H11AA1/Vishay/view-part/?ref=snap
U400: library part CMP-144040-000008-1, "SENSOR HUMIDITY 100 RH SMD"
U401: library part CMP-0944-00042-3, "IC INST AMP 1 CIRCUIT 8SOIC", Case/Package=D, Input Bias Current=65nA, Input Offset Voltage (Vos)=150uV, Input Resistance=100kR, Input Voltage Noise Density="18nV/sqrt Hz", Max Dual Supply Voltage=18V, Max Operating Temperature=125°C, Max Supply Voltage=36V, Min Dual Supply Voltage=1.35V, Min Operating Temperature=-40°C, Min Supply Voltage=2.7V, Nominal Supply Current=200uA, Output Current=16mA, Package Quantity=1, Power Supply Rejection Ratio (PSRR)=100dB, Voltage Gain=60dB, -3db Bandwidth=1MHz, Bandwidth=1MHz, Common Mode Rejection Ratio=84dB, Lead Free="Lead Free", Number of Amplifiers=1, Number Of Channels=1, Number of Circuits=1, Number of Elements=1, Number of Pins=8, Operating Supply Current=200uA, Output Current Per Channel=16mA, Packaging="Tape and Reel", Quiescent Current=200uA, Radiation Hardening=No, REACH SVHC="No SVHC", RoHS Compliant=Yes, Series=-, Slew Rate=1V/µs, Supply Current=200uA
U500: library part CMP-2000-06524-1, "Push-Pull Four Channel Driver with Diode, 4.5 to 36 V, -40 to 150 degC, 16-Pin PDIP, RoHS, Tube", Current - Output / Channel=600mA, Current - Peak Output=1.2A, Manufacturer=STMicroelectronics, On-State Resistance=-, Operating Temperature=-40°C~150°C, Package / Case="16-DIP(0.300\",7.62mm)", Package Description="16-Pin Thru-Hole Dual-In-Line, Body 20 x 6.85 mm, Pitch 2.54 mm", Package Reference=DIP-16, Standard Package=25, Supplier Device Package=16-PowerDIP, Voltage - Supply=4.5V~36V, Category=IntegratedCircuits(ICs), Datasheet URL=http://www.st.com/st-web-ui/static/active/en/resource/technical/document/datasheet/CD00000059.pdf, Datasheet Version=07/2003, Dynamic Catalog=HalfBridge, Family=PMIC-MOSFET,BridgeDrivers-InternalSwitch, Input Type=Non-Inverting, Manufacturer URL=http://www.st.com/, Mounting Technology=ThroughHole, Mounting Type=ThroughHole, Number Of Outputs=4, Other Names=497-2936-5, Other Related Documents=L293DViewAllSpecifications, Packaging=Tube, PartNumber=L293D, Series=-, Type=HalfBridge

## Via types
v1: diameter 1, hole 0.5, Top Layer to Bottom Layer, tented both sides, 410 vias
v2: diameter 0.7, hole 0.4, Top Layer to Bottom Layer, tented both sides, 2 vias

## Nets (pads, with @x,y where several pads share a name; then routed paths per layer and width w, separated by ;. In a path a pad name is that pad's centre, name@x,y a point inside that pad or via, vN(x,y) a via of type N, cw(c..) or ccw(c..) an arc to the next point about the centre after c; other vN are vias at no path point)
3v3: "LCD connector100.2" "LCD connector100.9" A600.2 B100.2 B101.2 B102.2 B103.2 B104.2 B106.2 B107.2 B108.2 B109.2 B110.2 C104.2 C105.2 C400.1 C401.1 C608.1 C609.1 D601.1 D700.1 D701.1 D702.1 F100.2 J100.2 R200.2 R203.2 R300.2 R400.2 R401.2 T602.1 U400.3 XH100.5 | length 487.4
  Top Layer w0.5: D601.1@27.94,44.628 27.94,41.275 35.56,33.655 52.07,33.655 52.498,34.083 52.498,43.264 ; J100.2@42.273,39.794 42.273,43.264 52.498,43.264 ; v1(53.975,46.736) 53.944,46.705 53.944,43.295 B103.2@53.914,43.264 52.498,43.264 ; B102.2@57.47,43.264 57.5,43.295 57.5,46.705 v1(57.531,46.736) ; B101.2@61.153,43.264 61.183,43.295 61.183,46.705 v1(61.214,46.736) ; B100.2@64.836,43.264 64.866,43.295 64.866,46.705 v1(64.897,46.736) ; B107.2@69.027,43.264 69.057,43.295 69.057,46.705 v1(69.088,46.736) ; v1(72.678,46.389) 72.678,46.254 72.964,45.968 B108.2@72.964,43.264 ; B109.2@76.901,43.264 76.901,46.675 v1(76.962,46.736) ; B110.2@81.092,43.264 v1(81.092,46.863) ; B104.2@85.283,43.264 85.283,46.863 v1@85.344,46.863 ; U400.3@88.113,96.888 91.74,96.888 92.064,97.212 92.064,97.317 92.093,97.346 92.266,97.346 C401.1@92.583,97.663 ; 88.787,28.575 88.787,31.377 89.281,31.871 89.281,34.322 90.17,35.211 90.17,45.847 v1(89.154,46.863) ; v1(90.805,46.736) 93.157,44.384 B106.2@93.157,43.264
  Top Layer w1: A600.2@44.323,74.662 44.33,74.669 50.793,74.669 A600.2@50.8,74.676 50.646,74.522 50.646,69.315 C608.1@50.546,69.215 C609.1@52.832,69.215 ; C609.1@52.705,69.215 52.805,69.315 52.805,70.712 T602.1@53.848,71.755 56.261,71.755 60.479,67.537 60.479,67.156 F100.2@60.579,67.056 ; 70.104,36.322 C105.2@70.104,34.671 70.104,30.324 71.287,29.141 71.287,28.575 ; R400.2@79.448,99.949 80.518,101.019 ; v1(80.518,101.981) 80.518,101.019 ; R401.2@81.788,99.949 81.588,99.949 80.518,101.019 ; v1(85.344,70.358) R300.2@87.376,70.358 ; C401.1@92.583,97.663 92.783,97.663 93.853,96.593 ; v1(93.853,95.758) 93.853,96.593 ; C400.1@95.123,97.663 94.923,97.663 93.853,96.593 ; v1(95.758,26.67) 98.298,26.67 98.425,26.797 D700.1@103.378,26.797 D702.1@108.966,26.797 ; R203.2@102.87,60.833 R200.2@102.87,58.166 102.97,58.066 102.97,56.415 v2(103.632,55.753)
  Bottom Layer w1: v1(50.8,74.93) 50.8,53.975 43.561,46.736 ; XH100.5@57.325,27.891 57.172,28.044 57.172,31.75 ; v1(76.962,46.736) 76.615,46.389 v1(72.678,46.389) 69.435,46.389 v1(69.088,46.736) v1(64.897,46.736) v1(61.214,46.736) v1(57.531,46.736) v1(53.975,46.736) 43.561,46.736 ; v1(80.518,101.981) 80.518,95.504 83.947,92.075 ; v1(81.092,46.863) v1(85.313,46.863) ; v1(93.853,95.758) 93.853,94.615 91.313,92.075 83.947,92.075 ; v2(103.632,55.753) 103.632,46.863 ; 43.561,46.736 42.273,45.448 J100.2@42.273,39.794 42.273,32.336 42.859,31.75 57.172,31.75 ; 57.172,31.75 70.548,31.75 71.134,31.164 71.134,28.728 71.419,28.443 71.419,26.963 72.005,26.377 110.793,26.377 111.379,26.963 111.379,46.277 110.793,46.863 103.632,46.863 ; 83.947,92.075 83.947,88.392 92.329,80.01 99.822,80.01 99.822,74.803 98.806,73.787 89.535,73.787 86.106,70.358 v1(85.344,70.358) 85.344,46.894 v1(85.313,46.863) ; v1(85.313,46.863) v1(89.154,46.863) 90.678,46.863 v1(90.805,46.736) 90.932,46.863 103.632,46.863
+5: A600.3 C402.1 C403.1 C500.1 C501.1 C605.1 C606.1 C607.1 C610.1 D600.1 I600.2 R600.2 T600.1 U401.8 U500.16 | length 136.8
  Top Layer w0.5: U401.8@89.154,79.043 89.154,78.651 89.192,78.613 C403.1@91.44,78.613
  Top Layer w0.7: D600.1@27.94,52.883 27.94,55.168 34.24,61.468 I600.2@34.29,61.468 ; 39.858,69.207 39.858,69.6 40.108,69.85 R600.2@40.132,69.85 ; R600.2@40.767,69.665 43.819,69.665 C610.1@44.069,69.415 ; C610.1@44.069,69.215 C610.1@44.069,69.415 ; A600.3@44.323,72.362 44.319,72.362 44.069,72.112 C610.1@44.069,69.415 ; U500.16@72.644,84.836 72.954,85.146 73.77,85.146 75.238,86.614 C501.1@75.438,86.614 C500.1@75.438,88.773 75.688,89.023 76.294,89.023 76.298,89.027 v1(77.47,89.027) ; C403.1@91.44,78.613 C402.1@93.98,78.613 96.693,78.613 97.201,78.105 v1(97.282,78.105)
  Top Layer w1: I600.2@34.29,61.468 34.611,61.468 36.77,63.627 C607.1@40.767,63.627 ; v1(36.322,64.77) 36.322,65.671 39.858,69.207 ; R600.2@40.317,69.665 40.767,69.215 C607.1@40.767,63.627 ; C606.1@52.705,61.976 52.505,61.976 50.854,63.627 C607.1@40.767,63.627
  Bottom Layer w0.7: v1(77.47,89.027) 80.518,89.027 91.44,78.105 v1(97.282,78.105)
  Bottom Layer w1: v1@36.576,65.024 48.768,77.216 66.421,77.216 72.595,83.39 72.595,84.787 U500.16@72.644,84.836
+24: C601.1 C602.1 C603.1 C604.1 S500.1 S501.1 S504.1 S505.1 S605.1 T601.7 U500.8 | length 125.2
  Top Layer w0.7: T601.7@33.401,74.295 C603.1@33.401,77.47
  Top Layer w1: 30.099,90.551 30.099,91.186
  Top Layer w1.2: 30.099,90.551 30.099,80.596 30.685,80.01 C604.1@33.274,80.01 C603.1@33.274,77.47
  Top Layer w1.4: C602.1@32.893,93.394 32.917,93.418 36.879,93.418 45.06,93.418 C601.1@45.085,93.443 ; 36.879,93.394 38.1,94.615 S605.1@38.1,99.669
  Top Layer w1.5: C601.1@45.085,93.206 C601.1@45.835,92.456 ; C601.1@45.085,93.443 45.085,94.193 47.285,96.393 S500.1@54.711,96.393 ; U500.8@54.864,92.456 C601.1@45.835,92.456 ; S501.1@75.692,96.266 75.842,96.116 76.858,96.116 79.121,93.853 79.121,81.82 75.819,78.518 ; S504.1@75.819,81.153 75.819,78.518 ; C601.1@45.835,92.456 45.835,91.071 47.535,89.371 47.535,84.191 48.414,83.312 52.806,83.312 S505.1@54.838,81.28 54.838,78.984 55.717,78.105 75.406,78.105 75.819,78.518
+220V: D200.2 D201.2 P200.1 R201.1 R204.1 R301.1 | length 112.1
  Top Layer w1: 146.828,95.918 cw(c147.089,95.918) 147.089,96.179 154.559,96.179
  Bottom Layer w2: R201.1@119.888,90.444 122.301,90.444 cw(c122.301,87.904) 124.841,87.904 D200.2@124.841,46.111 ; D201.2@143.51,45.905 143.51,86.761 cw(c146.05,86.761) 146.05,89.301 R204.1@157.226,89.301
AGND: P200.2 P201.2 P201.3 R303.1 | length 90.3
  Top Layer w2: R303.1@113.157,95.417 134.248,95.417 cw(c134.248,95.029) P200.2@134.636,95.029 ; P201.2@131.953,33.909 P201.3@137.033,33.909
  Bottom Layer w2: P201.2@131.953,33.909 132.224,33.909 132.724,34.409 133.067,34.409 134.239,35.581 134.239,95.205 134.636,95.602 P200.2@134.636,95.918
CH1: R206.1 S100.35 | length 15.1
  Top Layer w0.3: S100.35@77.85,57.317 92.027,57.317 92.583,56.761 R206.1@92.583,56.642
"Ch1 LED": R701.1 S100.33 | length 29.8
  Top Layer w0.3: S100.33@77.85,56.317 86.685,56.317 97.853,45.148 100.013,45.148 101.414,43.747 101.414,43.112 R701.1@101.727,42.799
CH2: R208.1 S100.38 | length 15.4
  Top Layer w0.3: S100.38@77.85,58.817 91.529,58.817 92.583,59.871 R208.1@92.583,60.071
"Ch2 LED": R704.1 S100.32 | length 27.3
  Top Layer w0.3: S100.32@76.009,54.476 87.514,54.476 97.536,44.454 R704.1@97.536,42.799
CS: "LCD connector100.7" B107.3 D104.1 S100.20 | length 28.9
  Top Layer w0.3: B107.3@69.977,41.064 70.009,41.096 S100.20@70.009,54.476
  Top Layer w0.5: B107.3@69.977,40.814 70.077,40.714 70.792,40.714 73.787,37.719 73.787,35.687 74.263,35.211 74.676,35.211 74.676,34.022 74.676,33.722 76.287,32.111 76.287,28.575
D/C: "LCD connector100.5" B109.3 D108.1 S100.22 | length 31.2
  Top Layer w0.3: S100.22@71.009,54.476 71.009,52.181 75.184,48.006 76.894,48.006 77.851,47.049 77.851,43.798
  Top Layer w0.5: B109.3@77.851,40.814 79.375,39.29 79.375,35.814 79.978,35.211 80.518,35.211 80.518,34.022 80.518,33.722 81.287,32.953 81.287,28.575 ; B109.3@77.851,41.064 77.851,43.798
ENABLE1: S100.48 U500.1 | length 46.5
  Top Layer w0.3: S100.48@77.85,63.817 77.85,64.515 v1(80.264,66.929)
  Bottom Layer w0.3: U500.1@72.644,92.456 72.644,94.65 72.82,94.826 76.278,94.826 76.454,94.65 76.454,88.011 77.343,87.122 80.85,87.122 86.233,81.739 86.233,76.2 80.137,70.104 v1@80.137,67.056
ENABLE2: S100.63 U500.9 | length 35.8
  Top Layer w0.3: v1(49.022,80.772) 50.8,80.772 55.245,76.327 61.214,76.327 69.009,68.532 S100.63@69.009,65.658
  Bottom Layer w0.3: v1(49.022,80.772) 49.156,80.638 49.945,80.638 50.192,80.391 50.519,80.391 54.864,84.736 U500.9@54.864,84.836
"ERR LED": R707.1 S100.34 | length 34.5
  Top Layer w0.3: S100.34@77.85,56.817 87.582,56.817 98.425,45.974 103.632,45.974 105.86,43.746 105.86,42.73 R707.1@105.918,42.672
FB: R600.1 R602.2 T601.4 | length 8.7
  Top Layer w0.7: T601.4@35.941,68.871 36.994,68.871 37.465,69.342 37.465,71.599 37.875,72.009 39.932,72.009 40.132,72.209 R602.2@40.132,74.041
FB_c: 